# Altium PCB Step..._Breakout.PcbDoc (part 1 of 3)
Units mil, origin at the board's own origin, x right, y up, seen from the top; angles counter-clockwise.
Board outline 1609 x 1792 mil, 2 copper layers (Top Layer, Bottom Layer), stack 57 mil thick; 115 components, 101 nets, 437 pads, 201 vias.
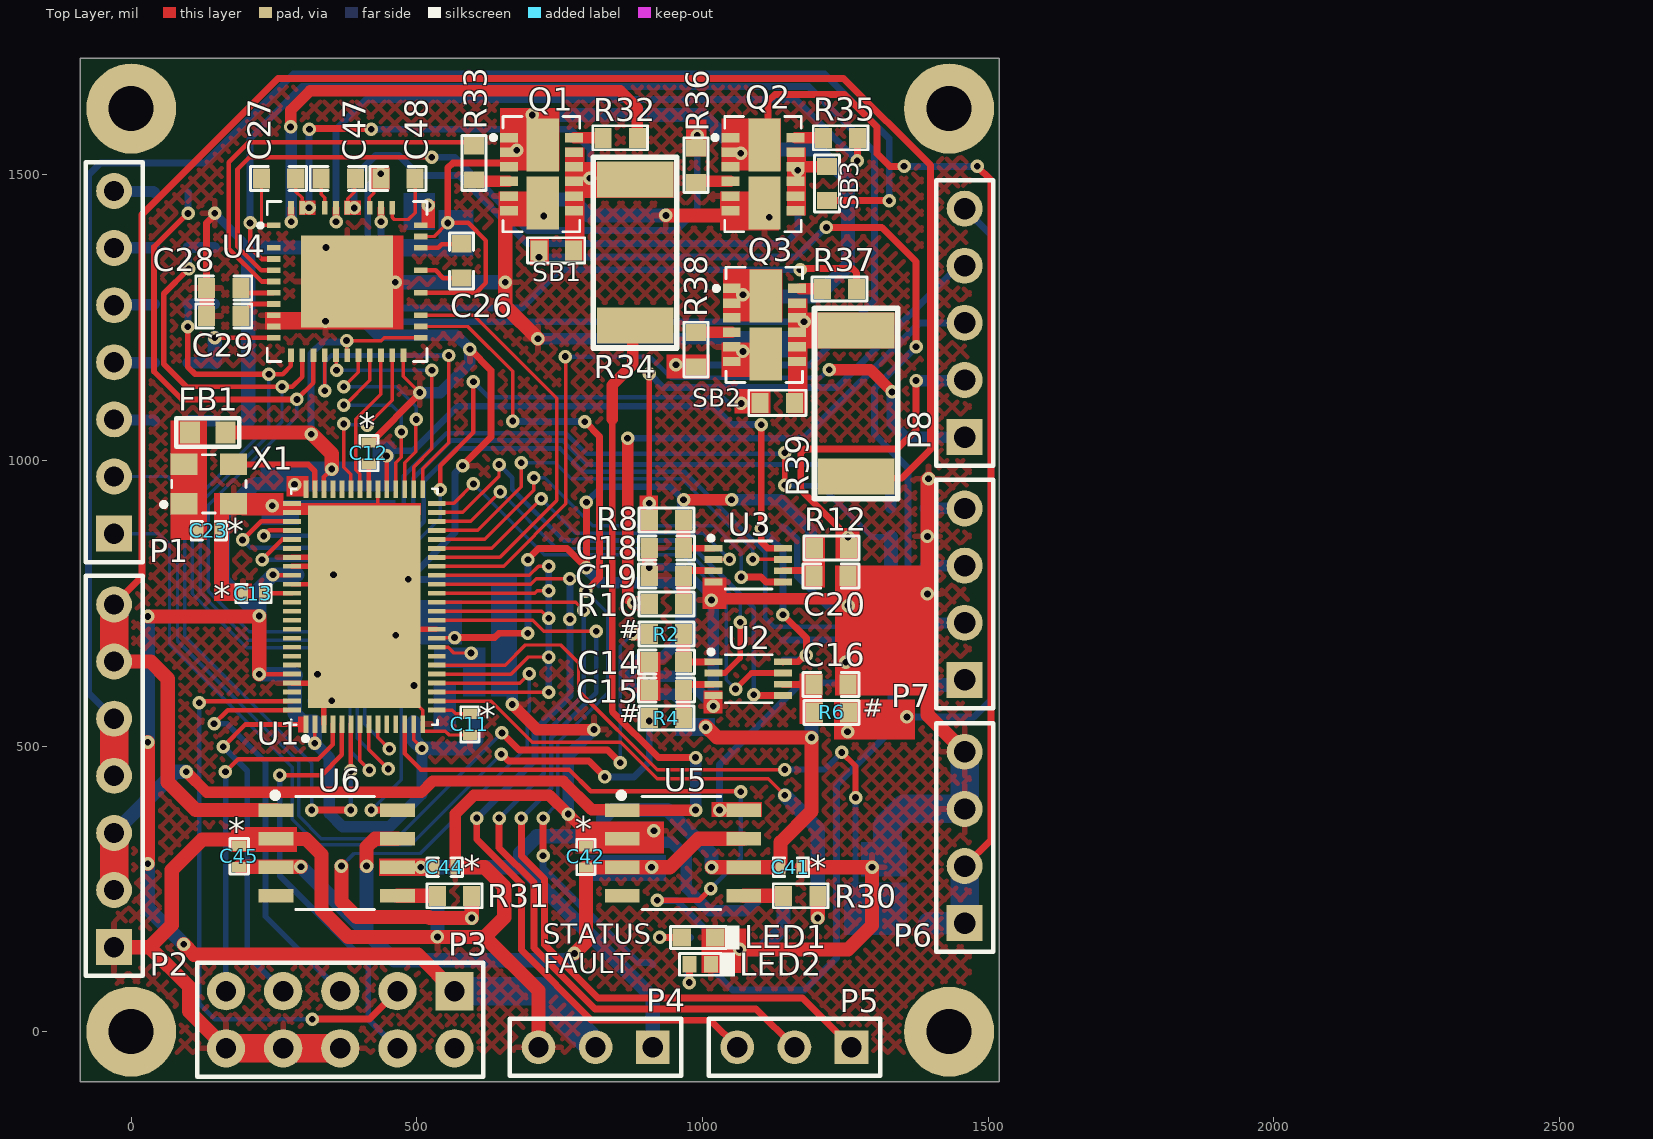
[diagram p0: Top Layer view]
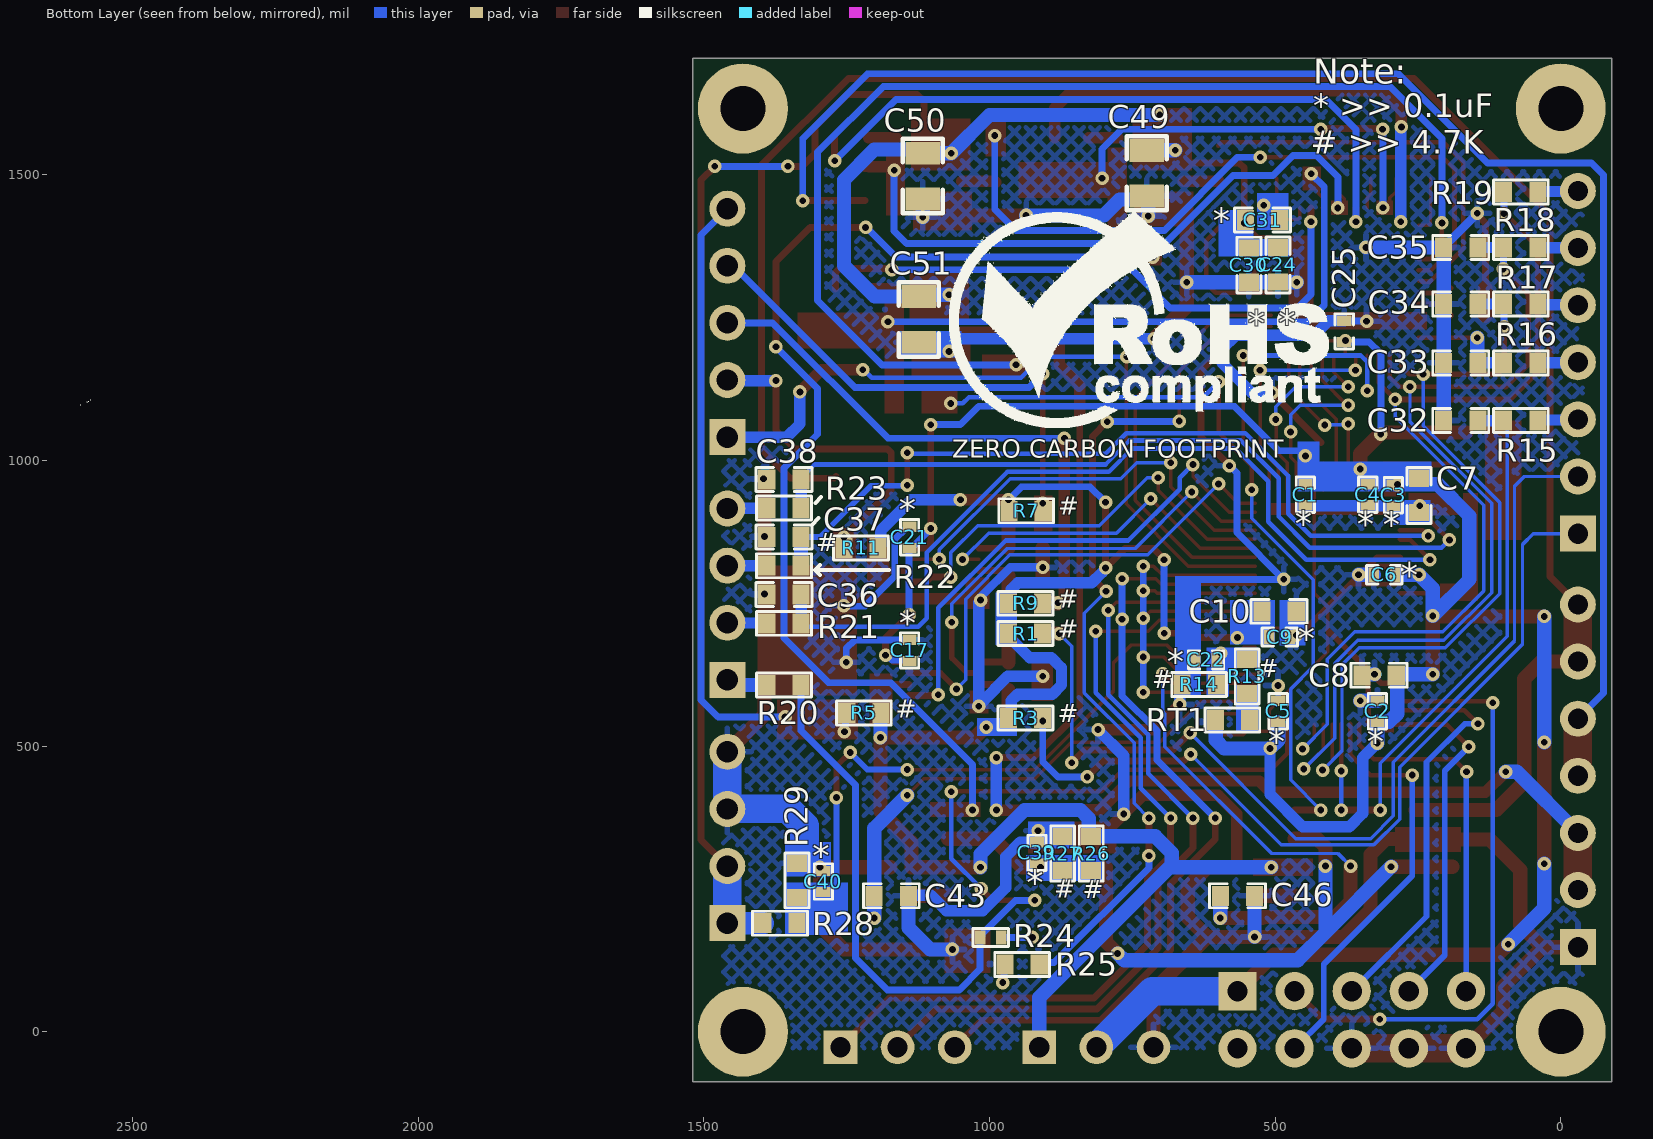
[diagram p1: Bottom Layer view, seen from below]
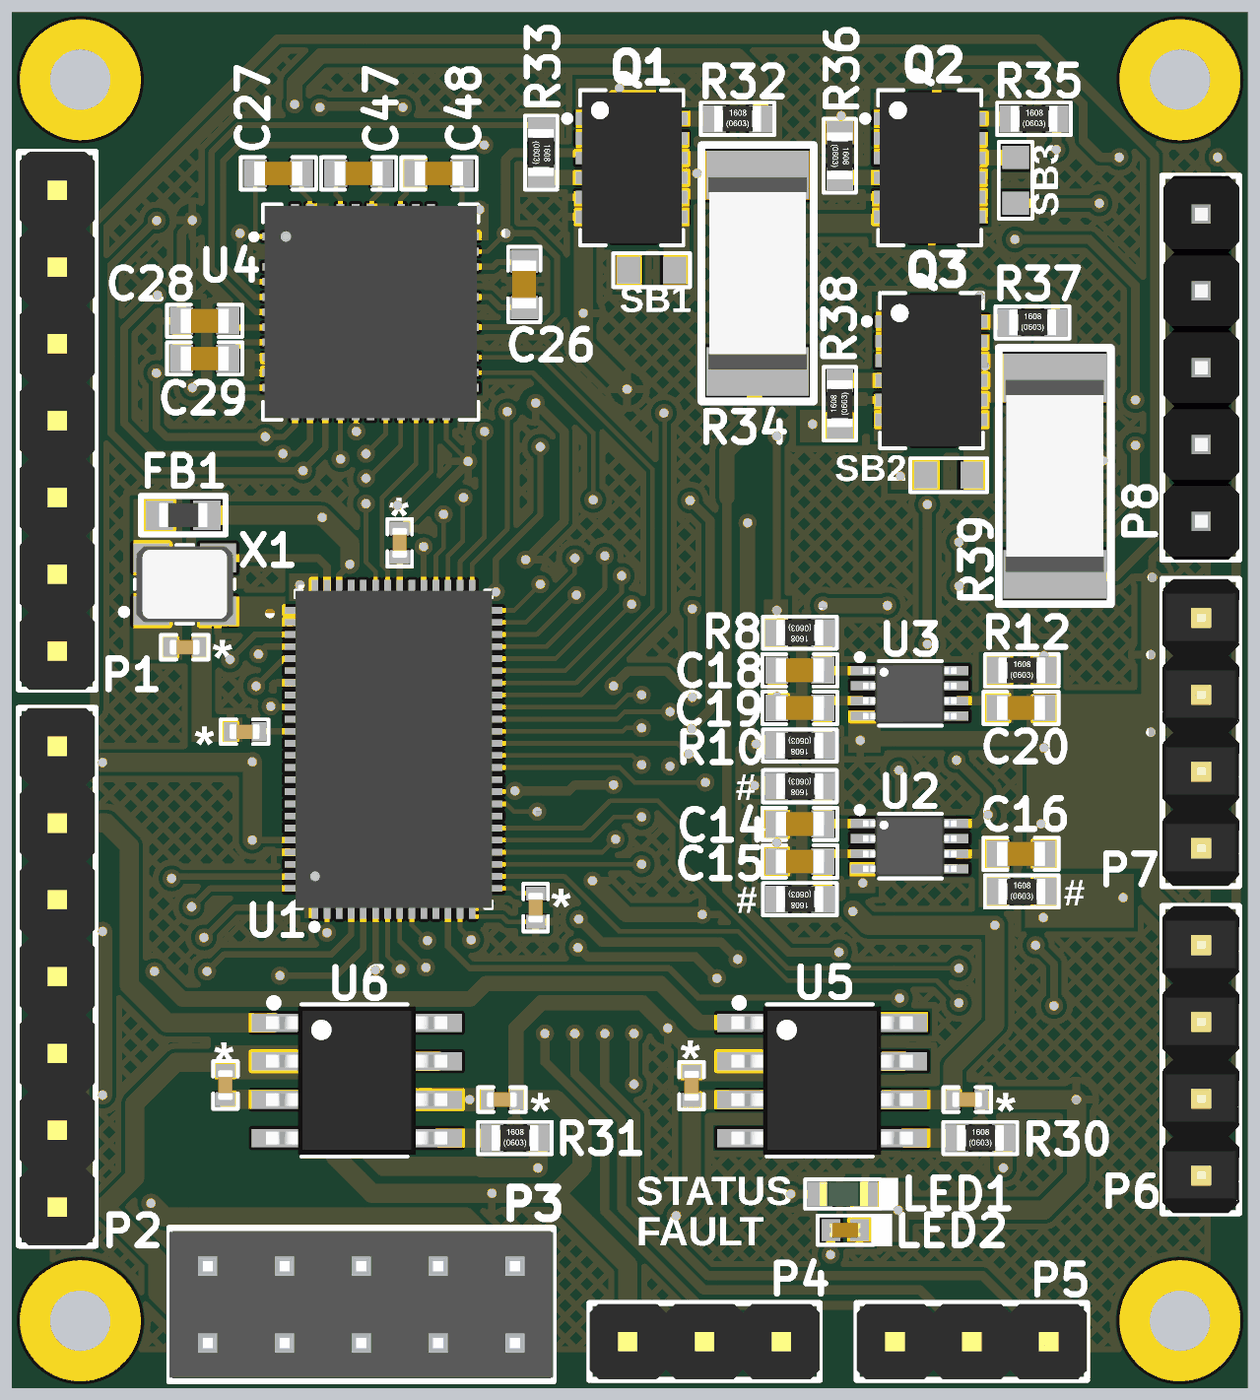
[diagram p3: 3D render of the assembled board from above, using the file's embedded part models]
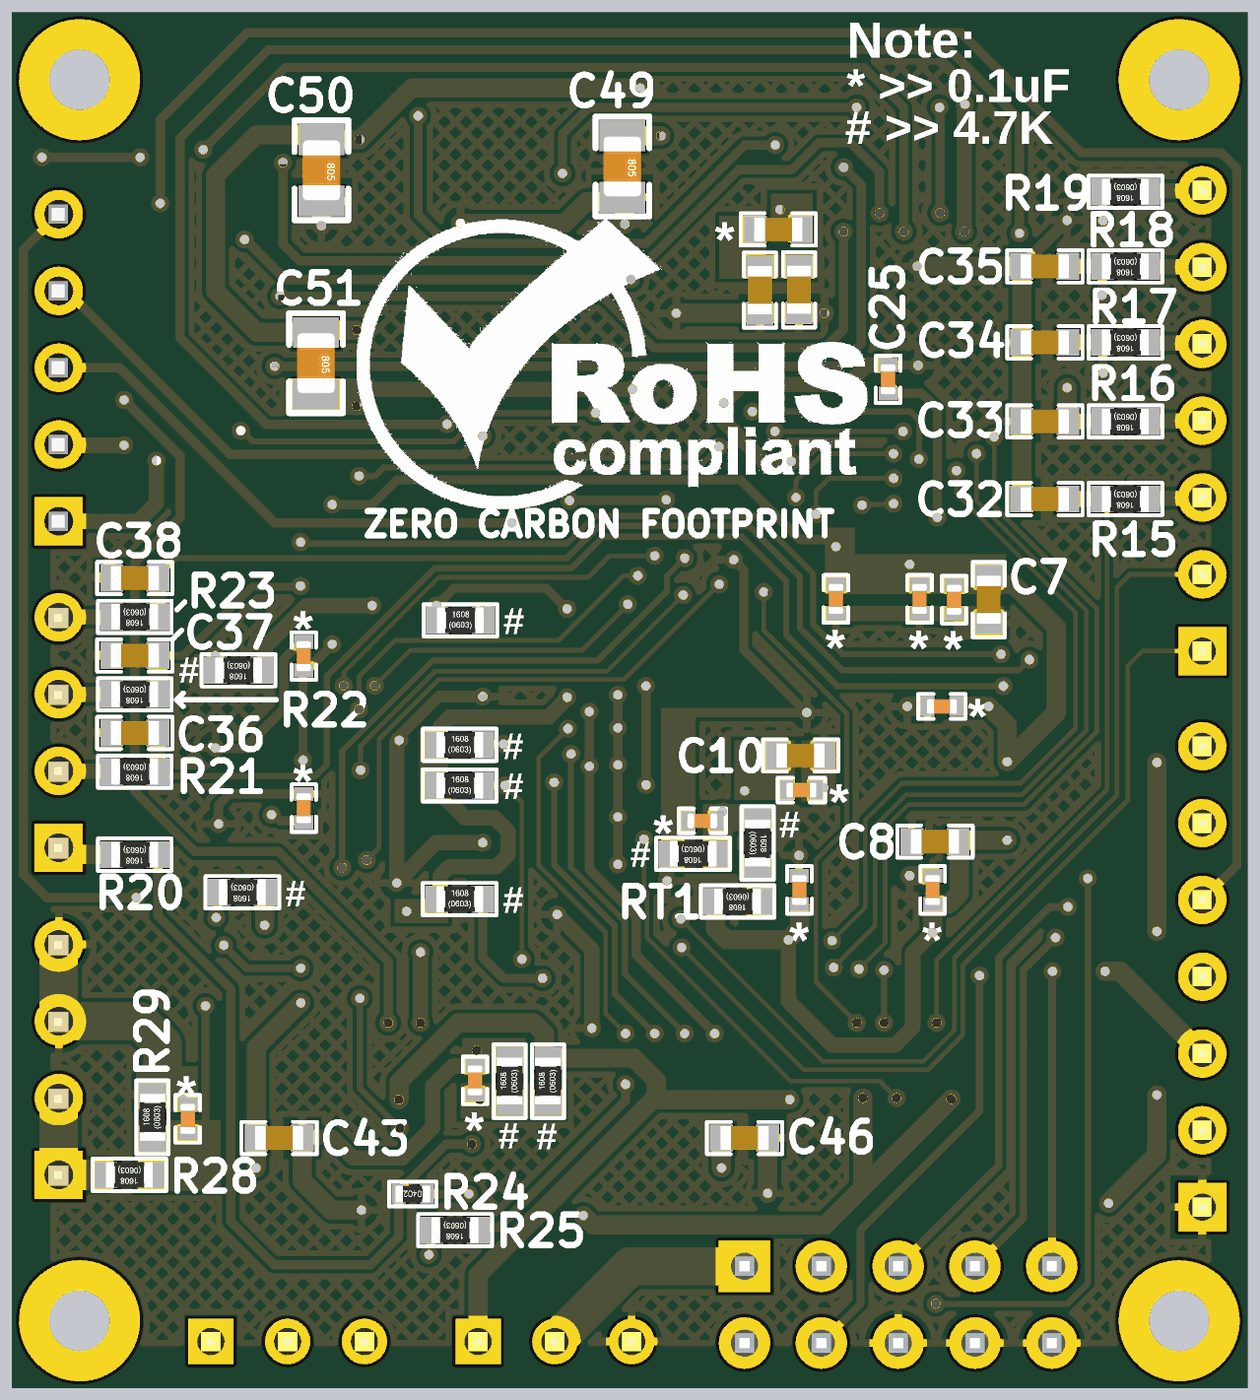
[diagram p4: 3D render of the assembled board from below, using the file's embedded part models]

## Layer stack, top to bottom
Top Solder: solder mask 3, Solder Resist, Dk 3.5
Top Layer: signal copper 10
Dielectric 1: dielectric 37, FR-4, Dk 4.8
Bottom Layer: signal copper 10
Bottom Solder: solder mask 3, Solder Resist, Dk 3.5

## Board outline
-89,-88 -89,1704 1520,1704 1520,-88

## Design rules (kind name [scope] priority, off if disabled: settings)
Clearance [All] p1: gap=5 ignorepadtopadclearanceinfootprint=FALSE
HoleSize [All] p1: absolutevalues=TRUE maxlimit=1000 minlimit=1 maxpercent=80.000 minpercent=20.000
HoleToHoleClearance [All] p1: gap=0 allowstackedmicrovias=TRUE
MinimumSolderMaskSliver [All] p1: minsoldermaskwidth=0
PolygonConnect [All] p1: connectstyle=Relief reliefconductorwidth=10 reliefentries=4 polygonreliefangle="90 Angle" airgapwidth=10
RoutingVias [All] p1: holewidth=11.81 width=23.62 viastyle="Through Hole" minholewidth=11.81 minwidth=23.62 maxholewidth=31.5 maxwidth=62.99
SilkToSilkClearance [All] p1: silktosilkclearance=0
SilkToSolderMaskClearance [IsPad] p1: minsilkscreentomaskgap=0 clearancetoexposedcopper=TRUE
SolderMaskExpansion [All] p1: expansion=4 istentingtop=FALSE
Width [All] p1: maxlimit=100 minlimit=6 preferedwidth=12 minimp=50.000000 maximp=50.000000 favimp=50.000000
25 further rules are at their usual default settings.

## Classes and differential pairs
component class U_TMC6100_Section: C24 C25 C26 C27 C28 C29 C30 C31 C47 C48 U4
component class U_TMC4671_Section: C1 C2 C3 C4 C5 C6 C7 C8 C9 C10 C11 C12 C13 C22 C23 FB1 R13 R14 RT1 U1 X1
component class U_MOSFET_Section: C49 C50 C51 Q1 Q2 Q3 R32 R33 R34 R35 R36 R37 R38 R39 SB1 SB2 SB3
component class U_Current_Sense_Section: C41 C42 C43 C44 C45 C46 R30 R31 U5 U6
component class U_Connector_Section: C32 C33 C34 C35 C36 C37 C38 C39 C40 LED1 LED2 P1 P3 P4 P5 P6 P8 R15 R16 R17 R18 R19 R20 R21 R22 R23 R24 R25 R26 R27 R28 R29
component class U_Buffer_Section: C14 C15 C16 C17 C18 C19 C20 C21 R1 R2 R3 R4 R5 R6 R7 R8 R9 R10 R11 R12 U2 U3

## Components (designator, comment, footprint, x,y, rotation, side; value= is the part's Value field where it differs from the comment)
C1 "0.1UF" Cap0402 447,940 r270 bottom locked
C2 "0.1UF" Cap0402 321,561 r90 bottom locked
C3 "0.1UF" Cap0402 293,939 r270 bottom locked
C4 "0.1UF" Cap0402 338,940 r270 bottom locked
C5 "0.1UF" Cap0402 494.61,561 r90 bottom locked
C6 "0.1UF" Cap0402 309,800 r0 bottom locked
C7 "4.7uF" Cap0603 248,939 r270 bottom locked
C8 "0.47uF" Cap0603 318,624 r0 bottom locked
C9 "0.1UF" Cap0402 492,691 r180 bottom locked
C10 "4.7uF" Cap0603 493,736 r180 bottom locked
C11 "0.1UF" Cap0402 593,538 r90 top locked
C12 "0.1UF" Cap0402 416,1013 r270 top locked
C13 "0.1UF" Cap0402 214,767 r0 top locked
C14 "1nF" Cap0603 937,647 r0 top locked
C15 "1nF" Cap0603 937,598 r0 top locked
C16 "1nF" Cap0603 1225,608 r180 top locked
C17 "0.1UF" Cap0402 1140,667.5 r90 bottom locked
C18 "100pF" Cap0603 937,847 r0 top locked
C19 "100pF" Cap0603 937,798 r0 top locked
C20 "100pF" Cap0603 1225,798 r180 top locked
C21 "0.1UF" Cap0402 1140,865.5 r90 bottom locked
C22 "0.1UF" Cap0402 621,651 r0 bottom locked
C23 "0.1UF" Cap0402 136,877 r180 top locked
C24 "0.1uF/100V" Cap0603 495.06,1342.43 r270 bottom locked
C25 "0.1UF" Cap0402 379,1226 r90 bottom locked
C26 "22nF" Cap0603 578.06,1349.43 r90 top locked
C27 "0.47uF" Cap0603 258,1494 r0 top locked
C28 "2.2uF" Cap0603 162,1302 r0 top locked
C29 "2.2uF" Cap0603 162,1253 r0 top locked
C30 "0.1uF/100V" Cap0603 546,1342 r270 bottom locked
C31 "0.1uF/100V" Cap0603 522,1421 r0 bottom locked
C32 "100pF" Cap0603 175,1070 r0 bottom locked
C33 "100pF" Cap0603 175,1171 r0 bottom locked
C34 "100pF" Cap0603 175,1274 r0 bottom locked
C35 "100pF" Cap0603 175,1373 r0 bottom locked
C36 "100pF" Cap0603 1360,765.4 r0 bottom locked
C37 "100pF" Cap0603 1360,866.2 r0 bottom locked
C38 "100pF" Cap0603 1360,967 r0 bottom locked
C39 "0.1UF" Cap0402 917,313 r90 bottom locked
C40 "0.1UF" Cap0402 1291,263 r90 bottom locked
C41 "0.1UF" Cap0402 1155,288 r0 top locked
C42 "0.1UF" Cap0402 796,306 r90 top locked
C43 "2.2nF" Cap0603 1172,238 r0 bottom locked
C44 "0.1UF" Cap0402 549,288 r0 top locked
C45 "0.1UF" Cap0402 189,307 r90 top locked
C46 "2.2nF" Cap0603 566,238 r0 bottom locked
C47 "0.47uF" Cap0603 362.5,1494 r0 top locked
C48 "0.47uF" Cap0603 467,1494 r180 top locked
C49 "2.2uF" Cap0805 725,1503 r270 bottom locked
C50 "2.2uF" Cap0805 1117,1498 r270 bottom locked
C51 "2.2uF" Cap0805 1124,1247 r270 bottom locked
FB1 "742792651" "IND 0603" 134,1049 r180 top locked
LED1 "D-060306B1" "LED 0603" 993,165 r0 top locked
LED2 "TJ-S1005SW4TGLC2R-A5" "LED 0402" 996,118 r0 top locked
P1 "61300711121" HDR1X7 -30,872 r90 top locked
P2 "61300711121" HDR1X7 -30,148 r90 top locked
P3 "67997-410HLF" HDR2X5 366,21 r180 top locked
P4 "61300311121" HDR1X3 913,-27 r180 top locked
P5 "61300311121" HDR1X3 1261,-27 r180 top locked
P6 "61300411121" HDR1X4 1459,190 r90 top locked
P7 "61300411121" HDR1X4 1459,616 r90 top locked
P8 "61300511121" HDR1X5 1459,1041 r90 top locked
Q1 "FDMD8260L" 12-Power3.3x5 718.09,1501.39 r0 top locked
Q2 "FDMD8260L" 12-Power3.3x5 1106.09,1501.39 r0 top locked
Q3 "FDMD8260L" 12-Power3.3x5 1108.39,1237.29 r0 top locked
R1 "4.7K" Res0603 937,697 r0 bottom locked
R2 "4.7K" Res0603 937,696 r0 top locked
R3 "4.7K" Res0603 937,549 r0 bottom locked
R4 "4.7K" Res0603 937,549 r0 top locked
R5 "4.7K" Res0603 1220,558 r180 bottom locked
R6 "4.7K" Res0603 1226,559 r180 top locked
R7 "4.7K" Res0603 936,912 r0 bottom locked
R8 "1K" Res0603 937,896 r0 top locked
R9 "4.7K" Res0603 937,750 r0 bottom locked
R10 "1K" Res0603 937,749 r0 top locked
R11 "4.7K" Res0603 1225,847 r180 bottom locked
R12 "1K" Res0603 1226,847 r180 top locked
R13 "4.7K" Res0603 549,622 r90 bottom locked
R14 "4.7K" Res0603 633,608 r180 bottom locked
R15 "270R" Res0603 70,1070 r180 bottom locked
R16 "270R" Res0603 70,1171 r180 bottom locked
R17 "270R" Res0603 70,1274 r180 bottom locked
R18 "270R" Res0603 70,1373 r180 bottom locked
R19 "150R" Res0603 70,1470 r180 bottom locked
R20 "150R" Res0603 1360,607 r180 bottom locked
R21 "270R" Res0603 1360,715 r180 bottom locked
R22 "270R" Res0603 1360,815.8 r180 bottom locked
R23 "270R" Res0603 1360,916.6 r180 bottom locked
R24 "100R" Res0402 998,165 r0 bottom locked
R25 "220R" Res0603 943,118 r180 bottom locked
R26 "4.7K" Res0603 822,312 r270 bottom locked
R27 "4.7K" Res0603 872,312 r270 bottom locked
R28 "47K" Res0603 1367,190 r180 bottom locked
R29 "1K" Res0603 1337,265 r270 bottom locked
R30 "1K" Res0603 1172,238 r180 top locked
R31 "1K" Res0603 566,238 r180 top locked
R32 "10R" Res0603 856,1565 r180 top locked
R33 "10R" Res0603 600,1521 r90 top locked
R34 "0.003R" "RES 2512" 882,1364 r90 top locked
R35 "10R" Res0603 1242,1565 r180 top locked
R36 "10R" Res0603 989,1517 r90 top locked
R37 "10R" Res0603 1240,1300 r180 top locked
R38 "10R" Res0603 989,1194 r270 top locked
R39 "0.003R" "RES 2512" 1269,1100 r90 top locked
RT1 "10K" Res0603 575,546 r180 bottom locked
SB1 "Solder Bridge" "Solder Bridge" 744,1368 r180 top locked
SB2 "Solder Bridge" "Solder Bridge" 1131,1101 r180 top locked
SB3 "Solder Bridge" "Solder Bridge" 1218,1485 r270 top locked
U1 "TMC4671-LA" "76-QFN (10.5x6.5)" 408,744 r90 top locked
U2 "74LVC3G17DC,125" 8-VSSOP 1080,618 r0 top locked
U3 "74LVC3G17DC,125" 8-VSSOP 1080,817 r0 top locked
U4 "TMC6100-LA" "37-QFN-EP (7x7)" 378.06,1313.43 r0 top locked
U5 "AD8418WBRZ-RL" SOIC-8 966,313 r0 top locked
U6 "AD8418WBRZ-RL" SOIC-8 360,313 r0 top locked
X1 "25MHz" SX3M25.000M20F30TNN 136,959 r0 top locked

## Footprints (in the part's own frame and the unit in brackets; to place one, negate y for a bottom-side part, rotate by r counter-clockwise, add the part's x,y. Pads: shape width x height; smd on the part's side, far side on the other; paste and mask are expansions set on the pad)
8-VSSOP [mm]
  rect 0.8x0.3 smd mask+0.102: 1(-1.55,0.75) 2(-1.55,0.25) 3(-1.55,-0.25) 4(-1.55,-0.75) 5(1.55,-0.75) 6(1.55,-0.25) 7(1.55,0.25) 8(1.55,0.75)
  silkscreen extent -1.72,-1.07 1.07,1.27, body extent -1.55,-1 1.55,1, height 0.9
12-Power3.3x5 [mm]
  rect 0.8x0.42 smd mask+0.102: 1(-1.45,1.625) 1(-1.45,1.625) 2(-1.45,0.975) 3(-1.45,0.325) 4(-1.45,-0.325) 5(-1.45,-0.975) 6(-1.45,-1.625) 7(1.45,-1.625) 8(1.45,-0.975) 9(1.45,-0.325) 10(1.45,0.325) 11(1.45,0.975) 12(1.45,1.625)
  rect 1.44x2.35 smd mask+0.102: 13(0.066,1.288) 14(0.066,-1.288)
  silkscreen extent -2.21,-2.57 1.7,2.57, body extent -1.65,-2.5 1.65,2.5, height 0.75
"37-QFN-EP (7x7)" [mm]
  rect 0.6x0.254 smd: 1(-3.275,2.5) 2(-3.275,1.5) 3(-3.275,1) 4(-3.275,0.5) 5(-3.275,0) 6(-3.275,-0.5) 7(-3.275,-1) 8(-3.275,-1.5) 9(-3.275,-2) 10(-3.275,-2.5) 22(3.275,-2.5) 23(3.275,-2) 24(3.275,-1.5) 25(3.275,-0.5) 26(3.275,0.5) 27(3.275,1.5) 28(3.275,2) 29(3.275,2.5)
  rect 0.254x0.6 smd: 11(-2.5,-3.275) 12(-2,-3.275) 13(-1.5,-3.275) 14(-1,-3.275) 15(-0.5,-3.275) 16(0,-3.275) 17(0.5,-3.275) 18(1,-3.275) 19(1.5,-3.275) 20(2,-3.275) 21(2.5,-3.275) 30(2,3.275) 31(1.5,3.275) 32(1,3.275) 33(0,3.275) 34(-0.5,3.275) 35(-1,3.275) 36(-2,3.275) 37(-2.5,3.275)
  rect 4.089x4.089 smd: 38(0,0)
  silkscreen extent -3.92,-3.56 3.56,3.56, body extent -3.5,-3.5 3.5,3.5, height 0.89
"76-QFN (10.5x6.5)" [mm]
  rect 0.78x0.22 smd: 1(-5.215,2.6) 2(-5.215,2.2) 3(-5.215,1.8) 4(-5.215,1.4) 5(-5.215,1) 6(-5.215,0.6) 7(-5.215,0.2) 8(-5.215,-0.2) 9(-5.215,-0.6) 10(-5.215,-1) 11(-5.215,-1.4) 12(-5.215,-1.8) 13(-5.215,-2.2) 14(-5.215,-2.6) 39(5.215,-2.6) 40(5.215,-2.2) 41(5.215,-1.8) 42(5.215,-1.4) 43(5.215,-1) 44(5.215,-0.6) 45(5.215,-0.2) 46(5.215,0.2) 47(5.215,0.6) 48(5.215,1) 49(5.215,1.4) 50(5.215,1.8) 51(5.215,2.2) 52(5.215,2.6)
  rect 0.22x0.78 smd: 15(-4.6,-3.215) 16(-4.2,-3.215) 17(-3.8,-3.215) 18(-3.4,-3.215) 19(-3,-3.215) 20(-2.6,-3.215) 21(-2.2,-3.215) 22(-1.8,-3.215) 23(-1.4,-3.215) 24(-1,-3.215) 25(-0.6,-3.215) 26(-0.2,-3.215) 27(0.2,-3.215) 28(0.6,-3.215) 29(1,-3.215) 30(1.4,-3.215) 31(1.8,-3.215) 32(2.2,-3.215) 33(2.6,-3.215) 34(3,-3.215) 35(3.4,-3.215) 36(3.8,-3.215) 37(4.2,-3.215) 38(4.6,-3.215) 53(4.6,3.215) 54(4.2,3.215) 55(3.8,3.215) 56(3.4,3.215) 57(3,3.215) 58(2.6,3.215) 59(2.2,3.215) 60(1.8,3.215) 61(1.4,3.215) 62(1,3.215) 63(0.6,3.215) 64(0.2,3.215) 65(-0.2,3.215) 66(-0.6,3.215) 67(-1,3.215) 68(-1.4,3.215) 69(-1.8,3.215) 70(-2.2,3.215) 71(-2.6,3.215) 72(-3,3.215) 73(-3.4,3.215) 74(-3.8,3.215) 75(-4.2,3.215) 76(-4.6,3.215)
  rect 9x5 smd paste-5: 77(0,0)
  silkscreen extent -5.97,-3.25 5.25,3.25, body extent -5.25,-3.25 5.25,3.25, height 0.89
Cap0402 [mil]
  rect 18x25 smd mask+2.36: 1(-18.5,0) 2(18.5,0)
  silkscreen extent -31,-16 31,16, body extent -20,-10 20,10, height 19
Cap0603 [mil]
  rect 30x35 smd mask+2.36: 1(-30,0) 2(30,0)
  silkscreen extent -49,-21 49,21, body extent -32,-16 31,16, height 34
Cap0805 [mil] "SMD 0805"
  rect 40x60 smd mask+2.76: 1(-40,0) 2(40,0)
  silkscreen extent -65,-35 65,35, body extent -39,-25 39,25, height 30
HDR1X3 [mm] "Connector; Header; 3 Position"
  rect 1.5x1.5 hole 0.9: 1(0,0)
  round 1.5 hole 0.9: 2(2.54,0) 3(5.08,0)
  silkscreen extent -1.27,-1.27 6.35,1.27, body extent -1.27,-1.24 6.35,1.25, height 8.54
HDR1X4 [mm] "Connector; Header; 4 Position"
  rect 1.6x1.6 hole 0.95: 1(0,0)
  round 1.6 hole 0.95: 2(2.54,0) 3(5.08,0) 4(7.62,0)
  silkscreen extent -1.27,-1.27 8.89,1.27, body extent -1.27,-1.27 8.89,1.27, height 9.5
HDR1X5 [mm] "Connector; Header; 5 Position"
  rect 1.6x1.6 hole 0.95: 1(0,0)
  round 1.6 hole 0.95: 2(2.54,0) 3(5.08,0) 4(7.62,0) 5(10.16,0)
  silkscreen extent -1.27,-1.27 11.43,1.27, body extent -1.27,-1.27 11.43,1.23, height 8.65
HDR1X7 [mm] "Connector; Header; 7 Position"
  rect 1.6x1.6 hole 0.9: 1(0,0)
  round 1.6 hole 0.9: 2(2.54,0) 3(5.08,0) 4(7.62,0) 5(10.16,0) 6(12.7,0) 7(15.24,0)
  silkscreen extent -1.27,-1.27 16.51,1.27, body extent -1.27,-1.24 16.51,1.25, height 8.74
HDR2X5 [mm] "Connector; Header; 5x2 Position"
  rect 1.7x1.7 hole 0.9: 1(-5.08,-1.27)
  round 1.7 hole 0.9: 2(-5.08,1.27) 3(-2.54,-1.27) 4(-2.54,1.27) 5(0,-1.27) 6(0,1.27) 7(2.54,-1.27) 8(2.54,1.27) 9(5.08,-1.27) 10(5.08,1.27)
  silkscreen extent -6.35,-2.54 6.35,2.54, body extent -6.35,-2.41 6.35,2.41, height 8.38
"IND 0603" [mm]
  rect 0.9x0.97 smd: 1(-0.785,0) 2(0.785,0)
  silkscreen extent -1.4,-0.64 1.4,0.64, body extent -0.8,-0.4 0.8,0.4, height 0.78
"LED 0402" [mm]
  rect 0.62x0.72 smd: 1(-0.475,0) 2(0.475,0)
  silkscreen extent -0.91,-0.53 1.55,0.53, body extent -0.5,-0.25 0.51,0.25, height 0.45
"LED 0603" [mm] "LED 0603"
  rect 0.82x0.82 smd: 1(-0.75,0) 2(0.75,0)
  silkscreen extent -1.24,-0.53 1.83,0.53, body extent -0.77,-0.4 0.83,0.4, height 0.38
Res0402 [mil]
  rect 18x25 smd mask+4: 1(-18.5,0) 2(18.5,0)
  silkscreen extent -32,-17 32,16, body extent -23,-11 23,11, height 16
Res0603 [mil]
  rect 30x35 smd: 1(-30,0) 2(30,0)
  silkscreen extent -48,-21 48,21, body extent -31,-17 31,17, height 18
"RES 2512" [mm] "0.033O ±1% 2W ±1800ppm/°C 2512 Low Resistors & Current Sense Resistors - Surface Mount RoHS"
  rect 1.6x3.4 smd: 1(-3.25,0) 2(3.25,0)
  silkscreen extent -4.24,-1.85 4.24,1.85, body extent -3.17,-1.63 3.18,1.63, height 0.58
SOIC-8 [mm]
  rect 1.55x0.6 smd: 1(-2.7,1.905) 2(-2.7,0.635) 3(-2.7,-0.635) 4(-2.7,-1.905) 5(2.7,-1.905) 6(2.7,-0.635) 7(2.7,0.635) 8(2.7,1.905)
  silkscreen extent -2.87,-2.51 1.68,2.69, body extent -3,-2.45 3,2.45, height 1.7
"Solder Bridge" [mil] "Solder Bridge ON"
  rect 30x35 smd: 1(-30,0) 2(30,0)
  silkscreen extent -50,-22 50,22
SX3M25.000M20F30TNN [mm]
  rect 1.2x0.95 smd: 1(-1.1,-0.875) 2(1.1,-0.875) 3(1.1,0.875) 4(-1.1,0.875)
  silkscreen extent -2.08,-1.3 1.65,1.3, body extent -1.6,-1.25 1.6,1.25, height 0.8

## Part data
C1 C2 C3 C4 C5 C6 C9 C11 C12 C13 C17 C21 C22 C23 C25 C39 C40 C41 C42 C44 C45: library part CL05B104KB54PNC, "CAP CER 0.1UF 50V X7R 0402", Manufacturer=Samsung, Supplier Part Number 1=1276-CL05B104KB54PNCDKR-ND, Manufacturer Part Number=CL05B104KB54PNC, Pricing 1="1=0.1, 10=0.067, 50=0.0366, 100=0.0299, 500=0.02138, 1000=0.01681, 2500=0.01528, 5000=0.01406 (USD)", Stock 1=8594, Supplier 1=Digi-Key
C7 C10: library part GRM188R61C475KAAJD, "CAP CER 4.7UF 16V X5R 0603", Case Code (Imperial)=0603, Case Code (Metric)=1608, Dielectric=X5R, Manufacturer=Murata, Max Operating Temperature=85°C, Min Operating Temperature=-55°C, Package Quantity=4000, Supplier Part Number 1=490-10481-1-ND, Tolerance=10%, Voltage Rating=16V, Capacitance=4.7uF, Case/Package=0603, ComponentLink1Description=http://components.arrow.com/part/dataview/50250782S9718068N2606?src-supplier=Arrow, ComponentLink1URL=http://components.arrow.com/part/dataview/50250782S9718068N2606?src-supplier=Arrow, Depth=0.8mm, Height=0.8mm, Lead Free="Lead Free", Length=1.6mm, Manufacturer Part Number=GRM188R61C475KAAJD, Material=Ceramic, Mount="Surface Mount", Packaging="Tape and Reel", Pricing 1="1=0.35, 10=0.246, 100=0.1473, 500=0.1105, 1000=0.09331 (USD)", REACH SVHC="No SVHC", Stock 1=407631, Supplier 1=Digi-Key, Termination=SMD/SMT, Thickness=0.037inch, Voltage Rating (DC)=16V, Weight=0.000222oz, Width=0.8mm
C8 C27 C47 C48: library part UMK107B7474KA-TR, "CAP CER 0.47uF 50V X7R 0603", Capacitance=470nF, Case Code (Imperial)=0603, Case Code (Metric)=1608, Dielectric=X7R, Manufacturer="Taiyo Yuden", Max Operating Temperature=125°C, Min Operating Temperature=-55°C, Package Quantity=1, Supplier Part Number 1=587-3170-1-ND, Tolerance=10%, Voltage=50V, Case/Package=0603, Category="Ceramic Capacitors", ComponentLink1Description=https://datasheet.ciiva.com/30063/972umk107b7474ka-tr-30063804.pdf?src-supplier=Onlinecomponents.com, ComponentLink1URL=https://datasheet.ciiva.com/30063/972umk107b7474ka-tr-30063804.pdf?src-supplier=Onlinecomponents.com, ComponentLink2Description=https://datasheet.ciiva.com/11600/umk107b7474ka-tr-ss-11600367.pdf?src-supplier=Avnet, ComponentLink2URL=https://datasheet.ciiva.com/11600/umk107b7474ka-tr-ss-11600367.pdf?src-supplier=Avnet, ComponentLink3Description=https://datasheet.ciiva.com/15922/257umk107b7474ka-tr-15922607.pdf?src-supplier=Onlinecomponents.com, ComponentLink3URL=https://datasheet.ciiva.com/15922/257umk107b7474ka-tr-15922607.pdf?src-supplier=Onlinecomponents.com, ComponentLink4Description=https://datasheet.ciiva.com/6274/mlcc-all-e-6274710.pdf?src-supplier=Digi-Key, ComponentLink4URL=https://datasheet.ciiva.com/6274/mlcc-all-e-6274710.pdf?src-supplier=Digi-Key, ComponentLink5Description=https://datasheet.ciiva.com/5412/mlcc01-e-5412119.pdf?src-supplier=Mouser, ComponentLink5URL=https://datasheet.ciiva.com/5412/mlcc01-e-5412119.pdf?src-supplier=Mouser, ComponentLink6Description=https://datasheet.ciiva.com/6274/mlcc-all-e-6274712.pdf?src-supplier=Digi-Key, ComponentLink6URL=https://datasheet.ciiva.com/6274/mlcc-all-e-6274712.pdf?src-supplier=Digi-Key, ComponentLink7Description=https://datasheet.ciiva.com/6274/mlcc-all-e-6274713.pdf?src-supplier=Digi-Key, ComponentLink7URL=https://datasheet.ciiva.com/6274/mlcc-all-e-6274713.pdf?src-supplier=Digi-Key, Construction=Flat, Depth=0.8mm, Halogen Free="Halogen Free", Height=0.8mm, Lead Free="Lead Free", Length=1.6mm, Manufacturer Part Number=UMK107B7474KA-TR, Mount="Surface Mount", Packaging="Tape and Reel", Pricing 1="1=0.21000, 10=0.14800, 50=0.08400, 100=0.06950, 500=0.04876, 1000=0.04036 (USD)", Radiation Hardening=No, RoHS=Yes, RoHS Compliant=Yes, Series=M, Stock 1=81, Supplier 1=Digi-Key, Termination=SMD/SMT, Thickness=0.035inch, Voltage Rating=50V, Voltage Rating (DC)=50V, Width=0.031inch
C14 C15 C16: library part CL10B102KC8NNNC, "CAP CER 1nF 100V X7R 0603", Case Code (Imperial)=0603, Case Code (Metric)=1608, Dielectric=X7R, Manufacturer=Samsung, Max Operating Temperature=125°C, Min Operating Temperature=-55°C, Package Quantity=1, Tolerance=10%, Voltage=100V, Capacitance=1nF, Case/Package=0603, Category="Ceramic Capacitors", ComponentLink1Description=https://datasheet.ciiva.com/25799/cl10b102kc8nnnc-25799476.pdf?src-supplier=Digi-Key, ComponentLink1URL=https://datasheet.ciiva.com/25799/cl10b102kc8nnnc-25799476.pdf?src-supplier=Digi-Key, ComponentLink2Description=https://datasheet.ciiva.com/29198/458286-da-01-en-vs-kondensator-0603-29198496.pdf?src-supplier=Conrad, ComponentLink2URL=https://datasheet.ciiva.com/29198/458286-da-01-en-vs-kondensator-0603-29198496.pdf?src-supplier=Conrad, ComponentLink3Description=https://datasheet.ciiva.com/26838/getdatasheetpartid-640779-26838395.pdf?src-supplier=Verical, ComponentLink3URL=https://datasheet.ciiva.com/26838/getdatasheetpartid-640779-26838395.pdf?src-supplier=Verical, ComponentLink4Description=https://datasheet.ciiva.com/26310/mlcc-catalogdownload2013-eng-26310266.pdf?src-supplier=Distrelec, ComponentLink4URL=https://datasheet.ciiva.com/26310/mlcc-catalogdownload2013-eng-26310266.pdf?src-supplier=Distrelec, ComponentLink5Description=https://datasheet.ciiva.com/16199/cl05b104kq5nnnc-16199246.pdf?src-supplier=Future+Electronics, ComponentLink5URL=https://datasheet.ciiva.com/16199/cl05b104kq5nnnc-16199246.pdf?src-supplier=Future+Electronics, Construction=Flat, Contact Plating=Tin, Depth=0.8mm, Height=0.8mm, Lead Free="Lead Free", Length=1.6mm, Manufacturer Part Number=CL10B102KC8NNNC, Material=Ceramic, Mount="Surface Mount", Packaging="Tape and Reel", Pricing 1="4000=0.00988, 8000=0.00987, 16000=0.00986, 24000=0.00985, 32000=0.00984, 40000=0.00982, 400000=0.00981 (USD)", Radiation Hardening=No, RoHS=Yes, RoHS Compliant=Yes, Series=CL, Stock 1=184000, Supplier 1=Avnet, Supplier Part Number 1=CL10B102KC8NNNC, Thickness=0.035inch, Voltage Rating=100V, Voltage Rating (DC)=100V, Width=0.031inch
C18 C19 C20 C32 C33 C34 C35 C36 C37 C38: library part GRM1885C1H101JA01D, "CAP CER 100PF 50V C0G/NP0 0603", Case Code (Imperial)=0603, Case Code (Metric)=1608, Dielectric=C0G, Dielectric Material=Ceramic, Insulation Resistance=10GR, Manufacturer=Murata, Max Operating Temperature=125°C, Min Operating Temperature=-55°C, Package Quantity=1, Temperature Coefficient=30ppm/°C, Tolerance=5%, Voltage=50V, Capacitance=100pF, Case/Package=0603, Category="Ceramic Capacitors", ComponentLink1Description=https://datasheet.ciiva.com/131/product-131088.pdf?src-supplier=Digi-Key, ComponentLink1URL=https://datasheet.ciiva.com/131/product-131088.pdf?src-supplier=Digi-Key, ComponentLink2Description=https://datasheet.ciiva.com/3777/grm1885c1h101ja0123-3777264.pdf?src-supplier=Arrow+Electronics, ComponentLink2URL=https://datasheet.ciiva.com/3777/grm1885c1h101ja0123-3777264.pdf?src-supplier=Arrow+Electronics, ComponentLink3Description=https://datasheet.ciiva.com/18100/getdatasheetpartid-26823-18100641.pdf?src-supplier=Verical, ComponentLink3URL=https://datasheet.ciiva.com/18100/getdatasheetpartid-26823-18100641.pdf?src-supplier=Verical, ComponentLink4Description=https://datasheet.ciiva.com/29149/450134-da-01-en-vs-kondensator-0603-29149008.pdf?src-supplier=Conrad, ComponentLink4URL=https://datasheet.ciiva.com/29149/450134-da-01-en-vs-kondensator-0603-29149008.pdf?src-supplier=Conrad, ComponentLink5Description=https://datasheet.ciiva.com/7828/4360-7828890.pdf?src-supplier=Element14, ComponentLink5URL=https://datasheet.ciiva.com/7828/4360-7828890.pdf?src-supplier=Element14, ComponentLink6Description=https://datasheet.ciiva.com/14116/grmseries-tc-hitype-eng-14116815.pdf?src-supplier=Distrelec, ComponentLink6URL=https://datasheet.ciiva.com/14116/grmseries-tc-hitype-eng-14116815.pdf?src-supplier=Distrelec, ComponentLink7Description=https://datasheet.ciiva.com/14116/grmseries-tc-hitype-eng-14116828.pdf?src-supplier=Distrelec, ComponentLink7URL=https://datasheet.ciiva.com/14116/grmseries-tc-hitype-eng-14116828.pdf?src-supplier=Distrelec, ComponentLink8Description=https://datasheet.ciiva.com/28556/4360-28556551.pdf?src-supplier=Element14, ComponentLink8URL=https://datasheet.ciiva.com/28556/4360-28556551.pdf?src-supplier=Element14, ComponentLink9Description=https://datasheet.ciiva.com/131/partnumbering-e-01-131087.pdf?src-supplier=Digi-Key, ComponentLink9URL=https://datasheet.ciiva.com/131/partnumbering-e-01-131087.pdf?src-supplier=Digi-Key, ComponentLink10Description=https://datasheet.ciiva.com/131/partnumbering-e-01-131089.pdf?src-supplier=Digi-Key, ComponentLink10URL=https://datasheet.ciiva.com/131/partnumbering-e-01-131089.pdf?src-supplier=Digi-Key, ComponentLink11Description=https://datasheet.ciiva.com/7828/4360-7828889.pdf?src-supplier=Element14, ComponentLink11URL=https://datasheet.ciiva.com/7828/4360-7828889.pdf?src-supplier=Element14, ComponentLink12Description=https://datasheet.ciiva.com/7828/4360-7828891.pdf?src-supplier=Element14, ComponentLink12URL=https://datasheet.ciiva.com/7828/4360-7828891.pdf?src-supplier=Element14, ComponentLink13Description=https://datasheet.ciiva.com/11605/c02e-11605557.pdf?src-supplier=Avnet, ComponentLink13URL=https://datasheet.ciiva.com/11605/c02e-11605557.pdf?src-supplier=Avnet, ComponentLink14Description=https://datasheet.ciiva.com/16291/product-16291613.pdf?src-supplier=Future+Electronics, ComponentLink14URL=https://datasheet.ciiva.com/16291/product-16291613.pdf?src-supplier=Future+Electronics, Depth=0.8mm, Height=0.8mm, Lead Free="Lead Free", Length=1.6mm, Manufacturer Part Number=GRM1885C1H101JA01D, Material=Ceramic, Mount="Surface Mount", Number of Pins=2, Packaging="Tape and Reel", Pricing 1="4000=0.03790, 8000=0.03760, 12000=0.03720, 40000=0.02940 (USD)", Radiation Hardening=No, REACH SVHC=Unknown, RoHS=Yes, RoHS Compliant=Yes, Stock 1=3884000, Supplier 1="Arrow Electronics", Supplier Part Number 1=GRM1885C1H101JA01D, Termination=SMD/SMT, Thickness=0.035inch, Voltage Rating=50V, Voltage Rating (DC)=50V, Weight=7.1E-05oz, Width=0.031inch
C24 C30 C31: library part CC0603KRX7R0BB104, "CAP CER 0.1UF 100V X7R 0603", Capacitance=100nF, Case Code (Imperial)=0603, Case Code (Metric)=1608, Dielectric=X7R, Manufacturer=Yageo, Max Operating Temperature=125°C, Min Operating Temperature=-55°C, Package Quantity=4000, Resistor Type=Ceramic, Supplier Part Number 1=311-1523-1-ND, Tolerance=10%, Voltage Rating=100V, Case/Package=0603, Category="Ceramic Capacitors", ComponentLink1Description=https://datasheet.ciiva.com/6277/mlccorderingcode-6277030.pdf?src-supplier=Digi-Key, ComponentLink1URL=https://datasheet.ciiva.com/6277/mlccorderingcode-6277030.pdf?src-supplier=Digi-Key, ComponentLink2Description=https://datasheet.ciiva.com/6277/mlccorderingcode-6277081.pdf?src-supplier=Digi-Key, ComponentLink2URL=https://datasheet.ciiva.com/6277/mlccorderingcode-6277081.pdf?src-supplier=Digi-Key, ComponentLink3Description=https://datasheet.ciiva.com/6277/mlccorderingcode-6277082.pdf?src-supplier=Digi-Key, ComponentLink3URL=https://datasheet.ciiva.com/6277/mlccorderingcode-6277082.pdf?src-supplier=Digi-Key, Depth=0.8mm, Lead Free="Lead Free", Length=0.063inch, Manufacturer Part Number=CC0603KRX7R0BB104, Mount="Surface Mount", Packaging="Tape and Reel", Pricing 1="1=0.19000, 10=0.13500, 50=0.07680, 100=0.06370, 500=0.04466, 1000=0.03696 (USD)", RoHS=Yes, RoHS Compliant=Yes, Series=CC, Stock 1=60476, Supplier 1=Digi-Key, Termination=SMD/SMT, Thickness=0.035inch, Voltage Rating (DC)=100V, Weight=7.1E-05oz, Width=0.031inch
C26: library part C0603C223K1RAC7867, "CAP CER 22nF 100V X7R 0603", Case Code (Imperial)=0603, Case Code (Metric)=1608, Dielectric=X7R, Dielectric Material=Ceramic, Manufacturer=KEMET, Manufacturer Part Number=C0603C223K1RACTU, Max Operating Temperature=125°C, Min Operating Temperature=-55°C, Package Quantity=4000, Tolerance=10%, Voltage=100V, Capacitance=22nF, Case/Package=0603, Category="Ceramic Capacitors", ComponentLink1Description=https://datasheet.ciiva.com/5416/kem-c1002-x7r-smd-5416629.pdf?src-supplier=Mouser, ComponentLink1URL=https://datasheet.ciiva.com/5416/kem-c1002-x7r-smd-5416629.pdf?src-supplier=Mouser, ComponentLink2Description=https://datasheet.ciiva.com/18192/getdatasheetpartid-306025-18192903.pdf?src-supplier=Verical, ComponentLink2URL=https://datasheet.ciiva.com/18192/getdatasheetpartid-306025-18192903.pdf?src-supplier=Verical, ComponentLink3Description=https://datasheet.ciiva.com/18101/getdatasheetpartid-38414-18101194.pdf?src-supplier=Verical, ComponentLink3URL=https://datasheet.ciiva.com/18101/getdatasheetpartid-38414-18101194.pdf?src-supplier=Verical, Construction=Flat, Depth=0.8mm, Dissipation Factor=2.5%, Height=0.8mm, Lead Pitch=0.7mm, Length=1.6mm, Mount="Surface Mount,PCB", Number of Pins=2, Packaging="Tape and Reel", Pricing 1="4000=0.03660 (USD)", Radiation Hardening=No, REACH SVHC="No SVHC", RoHS=Yes, RoHS Compliant=Yes, Series=C, Stock 1=108000, Supplier 1="Arrow Electronics", Supplier Part Number 1=C0603C223K1RACTU, Termination=SMD/SMT, Thickness=0.034inch, Voltage Rating=100V, Voltage Rating (DC)=100V, Width=0.031inch
C28 C29: library part CL10A225KO8NNNC, "CAP CER 2.2UF 16V X5R 0603", Case Code (Imperial)=0603, Case Code (Metric)=1608, Dielectric=X5R, Manufacturer=Samsung, Max Operating Temperature=85°C, Min Operating Temperature=-55°C, Package Quantity=4000, Supplier Part Number 1=1276-1040-1-ND, Tolerance=10%, Voltage=16V, Capacitance=2.2uF, Case/Package=0603, ComponentLink1Description=https://www.verical.com/server-webapp/html/getDatasheet?partID=355165&src-supplier=Verical, ComponentLink1URL=https://www.verical.com/server-webapp/html/getDatasheet?partID=355165&src-supplier=Verical, ComponentLink2Description=http://www.samsungsem.com/kr/support/product-search/mlcc/__icsFiles/afieldfile/2016/08/18/S_CL10A225KO8NNNC.pdf?src-supplier=Digi-Key, ComponentLink2URL=http://www.samsungsem.com/kr/support/product-search/mlcc/__icsFiles/afieldfile/2016/08/18/S_CL10A225KO8NNNC.pdf?src-supplier=Digi-Key, ComponentLink3Description=http://www1.futureelectronics.com/doc/SAMSUNG%20PASSIVE/CL05B104KQ5NNNC.pdf?src-supplier=Future+Electronics, ComponentLink3URL=http://www1.futureelectronics.com/doc/SAMSUNG%20PASSIVE/CL05B104KQ5NNNC.pdf?src-supplier=Future+Electronics, ComponentLink4Description=https://produktinfo.conrad.com/datenblaetter/450000-474999/457919-da-01-en-VS_KONDENSATOR_0603.pdf?src-supplier=Conrad, ComponentLink4URL=https://produktinfo.conrad.com/datenblaetter/450000-474999/457919-da-01-en-VS_KONDENSATOR_0603.pdf?src-supplier=Conrad, Contact Plating=Tin, Depth=0.8mm, Height=0.8mm, Lead Free="Lead Free", Length=1.6mm, Manufacturer Part Number=CL10A225KO8NNNC, Material=Ceramic, Mount="Surface Mount", Packaging="Tape and Reel", Pricing 1="1=0.13, 10=0.092, 100=0.0435, 500=0.03048, 1000=0.02524 (USD)", Radiation Hardening=No, Stock 1=421786, Supplier 1=Digi-Key, Thickness=0.035inch, Voltage Rating=16V, Voltage Rating (DC)=16V, Width=0.031inch
C43 C46: library part CC0603KRX7R9BB222, "CAP CER 2200PF 50V X7R 0603", Case Code (Imperial)=0603, Case Code (Metric)=1608, Dielectric=X7R, Insulation Resistance=10GR, Manufacturer=Yageo, Max Operating Temperature=125°C, Min Operating Temperature=-55°C, Package Quantity=1, Resistor Type=Ceramic, Tolerance=10%, Voltage=50V, Capacitance=2.2nF, Case/Package=0603, Category="Ceramic Capacitors", ComponentLink1Description=https://datasheet.ciiva.com/23768/1079489-23768004.pdf?src-supplier=Newark, ComponentLink1URL=https://datasheet.ciiva.com/23768/1079489-23768004.pdf?src-supplier=Newark, ComponentLink2Description=https://datasheet.ciiva.com/11788/0900766b8079c870-11788403.pdf?src-supplier=RSComponents, ComponentLink2URL=https://datasheet.ciiva.com/11788/0900766b8079c870-11788403.pdf?src-supplier=RSComponents, ComponentLink3Description=https://datasheet.ciiva.com/26862/getdatasheetpartid-403587-26862854.pdf?src-supplier=Verical, ComponentLink3URL=https://datasheet.ciiva.com/26862/getdatasheetpartid-403587-26862854.pdf?src-supplier=Verical, ComponentLink4Description=https://datasheet.ciiva.com/8033/70765-8033863.pdf?src-supplier=Element14, ComponentLink4URL=https://datasheet.ciiva.com/8033/70765-8033863.pdf?src-supplier=Element14, ComponentLink5Description=https://datasheet.ciiva.com/7978/1489800-7978172.pdf?src-supplier=Element14, ComponentLink5URL=https://datasheet.ciiva.com/7978/1489800-7978172.pdf?src-supplier=Element14, ComponentLink6Description=https://datasheet.ciiva.com/28450/1489800-28450632.pdf?src-supplier=Element14, ComponentLink6URL=https://datasheet.ciiva.com/28450/1489800-28450632.pdf?src-supplier=Element14, ComponentLink7Description=https://datasheet.ciiva.com/155/mlccorderingcode-155921.pdf?src-supplier=Digi-Key, ComponentLink7URL=https://datasheet.ciiva.com/155/mlccorderingcode-155921.pdf?src-supplier=Digi-Key, ComponentLink8Description=https://datasheet.ciiva.com/155/mlccorderingcode-155920.pdf?src-supplier=Digi-Key, ComponentLink8URL=https://datasheet.ciiva.com/155/mlccorderingcode-155920.pdf?src-supplier=Digi-Key, ComponentLink9Description=https://datasheet.ciiva.com/155/mlccorderingcode-155922.pdf?src-supplier=Digi-Key, ComponentLink9URL=https://datasheet.ciiva.com/155/mlccorderingcode-155922.pdf?src-supplier=Digi-Key, ComponentLink10Description=https://datasheet.ciiva.com/8033/1489800-8033864.pdf?src-supplier=Element14, ComponentLink10URL=https://datasheet.ciiva.com/8033/1489800-8033864.pdf?src-supplier=Element14, ComponentLink11Description=https://datasheet.ciiva.com/8033/1489800-8033862.pdf?src-supplier=Element14, ComponentLink11URL=https://datasheet.ciiva.com/8033/1489800-8033862.pdf?src-supplier=Element14, Depth=0.8mm, Dissipation Factor=2.5%, Halogen Free="Halogen Free", Height=0.8mm, Lead Free="Lead Free", Length=1.6mm, Manufacturer Part Number=CC0603KRX7R9BB222, Mount="Surface Mount", Number of Pins=2, Packaging="Tape and Reel", Pricing 1="4000=0.01010, 8000=0.00890, 12000=0.00830, 40000=0.00750 (USD)", Radiation Hardening=No, REACH SVHC="No SVHC", RoHS=Yes, RoHS Compliant=Yes, Series=CC, Stock 1=84000, Supplier 1="Arrow Electronics", Supplier Part Number 1=CC0603KRX7R9BB222, Termination=SMD/SMT, Thickness=0.035inch, Voltage Rating=50V, Voltage Rating (DC)=50V, Width=0.031inch
C49 C50 C51: library part GRM21BD72A225KE01L, "CAP CER 2.2UF 100V X7T 0805", Manufacturer=Murata, Supplier Part Number 1=490-GRM21BD72A225KE01LCT-ND, Category="Ceramic Capacitors", Manufacturer Part Number=GRM21BD72A225KE01L, Pricing 1="1=0.57000, 10=0.40200, 50=0.30360, 100=0.26450, 500=0.19592, 1000=0.16654 (USD)", RoHS=No, RoHS Compliant=Yes, Stock 1=1904, Supplier 1=Digi-Key
FB1: "Ferrite Beads WE-CBF 0603 SMD Bead 100MHz 600Ohm 1000mA", Case Code (Imperial)=0603, Case Code (Metric)=1608, Case/Package=SMD/SMT, Current Rating=1A, DC Resistance (DCR)=200mR, Inductance=0.36H, Manufacturer="Wurth Electronics", Max Operating Temperature=125°C, Min Operating Temperature=-55°C, Package Quantity=1, Supplier Part Number 1=1241835, Test Frequency=100MHz, Tolerance=25%, Category="Ferrite Beads and Chips", ComponentLink1Description=https://datasheet.ciiva.com/1475/1705833-1475349.pdf?src-supplier=Farnell, ComponentLink1URL=https://datasheet.ciiva.com/1475/1705833-1475349.pdf?src-supplier=Farnell, ComponentLink2Description=https://datasheet.ciiva.com/11803/0900766b80d2e079-11803680.pdf?src-supplier=RSComponents, ComponentLink2URL=https://datasheet.ciiva.com/11803/0900766b80d2e079-11803680.pdf?src-supplier=RSComponents, ComponentLink3Description=https://datasheet.ciiva.com/4940/742792651-72243-4940492.pdf?src-supplier=Mouser, ComponentLink3URL=https://datasheet.ciiva.com/4940/742792651-72243-4940492.pdf?src-supplier=Mouser, ComponentLink4Description=https://datasheet.ciiva.com/1013/742792651-1013527.pdf?src-supplier=Digi-Key, ComponentLink4URL=https://datasheet.ciiva.com/1013/742792651-1013527.pdf?src-supplier=Digi-Key, ComponentLink5Description=https://datasheet.ciiva.com/22711/1705833-22711420.pdf?src-supplier=Element14, ComponentLink5URL=https://datasheet.ciiva.com/22711/1705833-22711420.pdf?src-supplier=Element14, ComponentLink6Description=https://datasheet.ciiva.com/1013/742792651-1013528.pdf?src-supplier=Digi-Key, ComponentLink6URL=https://datasheet.ciiva.com/1013/742792651-1013528.pdf?src-supplier=Digi-Key, ComponentLink7Description=https://datasheet.ciiva.com/1013/742792651-1013529.pdf?src-supplier=Digi-Key, ComponentLink7URL=https://datasheet.ciiva.com/1013/742792651-1013529.pdf?src-supplier=Digi-Key, Core Material=Ferrite, Depth=0.8mm, Height=0.8mm, Impedance=600R, Lead Free="Lead Free", Length=1.6mm, Manufacturer Part Number=742792651, Material=Ferrite, Max Current Rating=1A, Max DC Current=1A, Mount="Surface Mount", Number of Lines=1, Packaging="Tape and Reel", Pricing 1="50=0.13400, 500=0.12400, 2500=0.11200, 5000=0.10000, 12500=0.09000 (GBP)", REACH SVHC=Unknown, Resistance=200mR, RoHS=Yes, RoHS Compliant=Yes, Series=WE-CBF, Stock 1=6200, Supplier 1=RSComponents, Termination=SMD/SMT, Weight=0.000141oz, Width=0.8mm
LED1: "blue 0603 Light Emitting Diodes (LED) ROHS", Manufacturer=ARKLED, ComponentLink1Description=LCSC, ComponentLink1URL=https://lcsc.com/product-detail/Light-Emitting-Diodes-span-style-background-color-ff0-LED-span_ARKLED-Wuxi-ARK-Tech-Elec-D-060306B1_C118339.html, Manufacturer Part Number=D-060306B1
LED2: "Red 625nm 0402 Light Emitting Diodes (LED) RoHS", Manufacturer=TOGIALED, Package=0402, Manufacturer Part No=TJ-S1005SW4TGLC2R-A5
P1 P2: "CONN HEADER VERT 7POS 2.54MM", Color=Black, Manufacturer="Wurth Electronics", Supplier Part Number 1=732-5320-ND, ComponentLink1Description=https://katalog.we-online.de/em/datasheet/6130xx11121.pdf?src-supplier=Digi-Key, ComponentLink1URL=https://katalog.we-online.de/em/datasheet/6130xx11121.pdf?src-supplier=Digi-Key, Connector Type="Male Pin", Contact Material=Copper, Contact Mating Length=0.236inch, Contact Plating=Gold, Gender=Male, Manufacturer Part Number=61300711121, Mount="Through Hole", Number of Contacts=7, Number of Positions=7, Number of Rows=1, Packaging=Bulk, Pitch=0.1inch, Pricing 1="1=0.37, 10=0.315, 25=0.2632, 50=0.219, 100=0.199, 1000=0.181 (USD)", REACH SVHC=Unknown, Stock 1=4017, Supplier 1=Digi-Key, Termination=Solder
P3: "CONN HEADER VERT 10POS 2.54MM", Color=Black, Current Rating=3A, Flammability Rating="UL94 V-0", Insulation Resistance=5GR, Manufacturer="Amphenol FCI", Max Operating Temperature=125°C, Max Voltage Rating (AC)=1.5kV, Min Operating Temperature=-65°C, Package Quantity=100, Supplier Part Number 1=609-3243-ND, ComponentLink1Description=http://www.mouser.com/ds/2/154/bus-12-050-356030.pdf?src-supplier=Mouser, ComponentLink1URL=http://www.mouser.com/ds/2/154/bus-12-050-356030.pdf?src-supplier=Mouser, ComponentLink2Description=http://portal.fciconnect.com/Comergent/fci/drawing/67996.pdf?src-supplier=Avnet, ComponentLink2URL=http://portal.fciconnect.com/Comergent/fci/drawing/67996.pdf?src-supplier=Avnet, ComponentLink3Description=https://www.alliedelec.com/m/d/738c41368b909dba4b47243c40762f88.pdf?src-supplier=Allied+Electronics, ComponentLink3URL=https://www.alliedelec.com/m/d/738c41368b909dba4b47243c40762f88.pdf?src-supplier=Allied+Electronics, ComponentLink4Description=https://cdn.amphenol-icc.com/media/wysiwyg/files/drawing/67996.pdf?src-supplier=Digi-Key, ComponentLink4URL=https://cdn.amphenol-icc.com/media/wysiwyg/files/drawing/67996.pdf?src-supplier=Digi-Key, ComponentLink5Description=http://portal.fciconnect.com/Comergent/fci/drawing/67996.pdf?src-supplier=Avnet+Europe, ComponentLink5URL=http://portal.fciconnect.com/Comergent/fci/drawing/67996.pdf?src-supplier=Avnet+Europe, ComponentLink6Description=http://www.farnell.com/datasheets/1748781.pdf?src-supplier=Element14, ComponentLink6URL=http://www.farnell.com/datasheets/1748781.pdf?src-supplier=Element14, Connector Type="Male Pin", Contact Gender=Male, Contact Material=Bronze, Contact Mating Length=0.23inch, Contact Plating=Tin, Contact Post Length=3.05mm, Depth=4.83mm, Gender=Male, Housing Color=Black, Housing Material=Thermoplastic, Length=12.7mm, Manufacturer Part Number=67997-410HLF, Mount="Through Hole", Number of Contacts=10, Number of Positions=10, Number of Rows=2, Orientation=Straight, Packaging=Bulk, Pitch=2.54mm, Pricing 1="1=0.28, 10=0.266, 100=0.1864, 500=0.15982, 1000=0.13318, 5000=0.11415, 10000=0.10654 (USD)", REACH SVHC="No SVHC", Row Spacing=0.1inch, Stock 1=7926, Supplier 1=Digi-Key, Termination=Solder, Voltage Rating=1.5kV
P4 P5: "CONN HEADER VERT 3POS 2.54MM", Color=Black, Manufacturer="Wurth Electronics", Supplier Part Number 1=732-5316-ND, ComponentLink1Description=http://www.farnell.com/cad/1737268.pdf?src-supplier=Element14, ComponentLink1URL=http://www.farnell.com/cad/1737268.pdf?src-supplier=Element14, ComponentLink2Description=https://katalog.we-online.de/em/datasheet/6130xx11121.pdf?src-supplier=Digi-Key, ComponentLink2URL=https://katalog.we-online.de/em/datasheet/6130xx11121.pdf?src-supplier=Digi-Key, Connector Type="Male Pin", Contact Material=Copper, Contact Mating Length=0.236inch, Contact Plating=Gold, Gender=Male, Lead Free="Lead Free", Manufacturer Part Number=61300311121, Mount="Through Hole", Number of Contacts=3, Number of Positions=3, Number of Rows=1, Packaging=Bulk, Pitch=0.1inch, Pricing 1="1=0.13, 10=0.106, 25=0.088, 50=0.074, 100=0.067, 1000=0.061 (USD)", REACH SVHC=Unknown, Stock 1=81286, Supplier 1=Digi-Key, Termination=Solder
P6 P7: "CONN HEADER VERT 4POS 2.54MM", Color=Black, Manufacturer="Wurth Electronics", Supplier Part Number 1=732-5317-ND, ComponentLink1Description=http://www.farnell.com/cad/1737268.pdf?src-supplier=Element14, ComponentLink1URL=http://www.farnell.com/cad/1737268.pdf?src-supplier=Element14, ComponentLink2Description=https://katalog.we-online.de/em/datasheet/6130xx11121.pdf?src-supplier=Digi-Key, ComponentLink2URL=https://katalog.we-online.de/em/datasheet/6130xx11121.pdf?src-supplier=Digi-Key, Connector Type="Male Pin", Contact Material=Copper, Contact Mating Length=0.236inch, Contact Plating=Gold, Gender=Male, Lead Free="Lead Free", Manufacturer Part Number=61300411121, Mount="Through Hole", Number of Contacts=4, Number of Positions=4, Number of Rows=1, Packaging=Bulk, Pitch=0.1inch, Pricing 1="1=0.18, 10=0.153, 25=0.1272, 50=0.106, 100=0.096, 1000=0.088 (USD)", REACH SVHC=Unknown, Stock 1=20544, Supplier 1=Digi-Key, Termination=Solder
P8: "CONN HEADER VERT 5POS 2.54MM", Color=Black, Manufacturer="Wurth Electronics", Supplier Part Number 1=732-5318-ND, ComponentLink1Description=https://katalog.we-online.de/em/datasheet/6130xx11121.pdf?src-supplier=Digi-Key, ComponentLink1URL=https://katalog.we-online.de/em/datasheet/6130xx11121.pdf?src-supplier=Digi-Key, ComponentLink2Description=http://www.farnell.com/cad/1737268.pdf?src-supplier=Element14, ComponentLink2URL=http://www.farnell.com/cad/1737268.pdf?src-supplier=Element14, Connector Type="Male Pin", Contact Material=Copper, Contact Mating Length=0.236inch, Contact Plating=Gold, Gender=Male, Lead Free="Lead Free", Manufacturer Part Number=61300511121, Mount="Through Hole", Number of Contacts=5, Number of Positions=5, Number of Rows=1, Packaging=Bulk, Pitch=0.1inch, Pricing 1="1=0.25, 10=0.209, 25=0.174, 50=0.145, 100=0.132, 1000=0.12 (USD)", REACH SVHC=Unknown, Stock 1=27960, Supplier 1=Digi-Key, Termination=Solder
Q1 Q2 Q3: "MOSFET 2N-CH 60V 15A 12POWER", Continuous Drain Current (ID)=15A, Drain to Source Voltage (Vdss)=60V, Input Capacitance=5.245nF, Manufacturer="ON Semiconductor / Fairchild", Max Operating Temperature=150°C, Max Power Dissipation=1W, Min Operating Temperature=-55°C, Supplier Part Number 1=54AH8638, Category=MOSFETs, ComponentLink1Description=https://www.fairchildsemi.com/datasheets/FD/FDMD8260L.pdf?src-supplier=Digi-Key, ComponentLink1URL=https://www.fairchildsemi.com/datasheets/FD/FDMD8260L.pdf?src-supplier=Digi-Key, Element Configuration=Dual, FET Type="2 N-Channel", Manufacturer Part Number=FDMD8260L, Mount="Surface Mount", Number of Pins=12, Packaging="Tape and Reel", Pricing 1="1=3.19000, 10=2.87000, 25=2.72000, 50=2.54000, 100=2.35000, 250=2.18000, 500=2.01000, 1000=1.76000 (USD)", Rds On Max=5.8mR, RoHS=Yes, RoHS Compliant=Yes, Supplier 1=Newark, Weight=0.0823188g
R1 R2 R3 R4 R5 R6 R7 R9 R11 R13 R14 R26 R27: library part RC0603FR-074K7L, "RES SMD 4.7K OHM 1% 1/10W 0603", Case Code (Imperial)=0603, Case Code (Metric)=1608, Manufacturer=Yageo, Max Operating Temperature=155°C, Min Operating Temperature=-55°C, Power Rating=100mW, Resistance=4.7kR, Supplier Part Number 1=311-4.70KHRCT-ND, Temperature Coefficient=100ppm/°C, Tolerance=1%, Voltage Rating=50V, Case/Package=0603, ComponentLink1Description=https://www.verical.com/server-webapp/html/getDatasheet?partID=422754&src-supplier=Verical, ComponentLink1URL=https://www.verical.com/server-webapp/html/getDatasheet?partID=422754&src-supplier=Verical, ComponentLink2Description=http://www.farnell.com/datasheets/2167052.pdf?src-supplier=Element14, ComponentLink2URL=http://www.farnell.com/datasheets/2167052.pdf?src-supplier=Element14, ComponentLink3Description=http://www.farnell.com/datasheets/38590.pdf?src-supplier=Element14, ComponentLink3URL=http://www.farnell.com/datasheets/38590.pdf?src-supplier=Element14, ComponentLink4Description=http://www.farnell.com/datasheets/1868787.pdf?src-supplier=Element14, ComponentLink4URL=http://www.farnell.com/datasheets/1868787.pdf?src-supplier=Element14, Composition="Thick Film", Depth=0.8mm, Height=0.45mm, Lead Free="Lead Free", Lead Pitch=0.3mm, Length=1.6mm, Manufacturer Part Number=RC0603FR-074K7L, Military Standard=Not, Number of Pins=2, Packaging="Tape and Reel", Pricing 1="1=0.1, 10=0.023, 100=0.0094, 1000=0.00421, 2500=0.00366 (USD)", REACH SVHC="No SVHC", Stock 1=5337567, Supplier 1=Digi-Key, Termination=SMD/SMT, Voltage Rating (DC)=50V, Width=0.8mm
R8 R10 R12 R29 R30 R31: library part RC0603FR-071KL, "RES SMD 1K OHM 1% 1/10W 0603", Case Code (Imperial)=0603, Case Code (Metric)=1608, Manufacturer=Yageo, Max Operating Temperature=155°C, Min Operating Temperature=-55°C, Power Rating=100mW, Resistance=1kR, Supplier Part Number 1=311-1.00KHRDKR-ND, Temperature Coefficient=100ppm/°C, Tolerance=1%, Voltage Rating=50V, Case/Package=0603, ComponentLink1Description=https://www.verical.com/server-webapp/html/getDatasheet?partID=409289&src-supplier=Verical, ComponentLink1URL=https://www.verical.com/server-webapp/html/getDatasheet?partID=409289&src-supplier=Verical, ComponentLink2Description=http://documents.rs-components.com/techlib://itc_doclist_GB.htm?stockno=5048928&src-supplier=RSComponents, ComponentLink2URL=http://documents.rs-components.com/techlib://itc_doclist_GB.htm?stockno=5048928&src-supplier=RSComponents, ComponentLink3Description=http://www.yageo.com/documents/recent/PYu-RC0603_51_RoHS_L_4.pdf?src-supplier=Avnet+Europe, ComponentLink3URL=http://www.yageo.com/documents/recent/PYu-RC0603_51_RoHS_L_4.pdf?src-supplier=Avnet+Europe, ComponentLink4Description=http://www.farnell.com/datasheets/2167052.pdf?src-supplier=Element14, ComponentLink4URL=http://www.farnell.com/datasheets/2167052.pdf?src-supplier=Element14, ComponentLink5Description=http://www.farnell.com/datasheets/1868787.pdf?src-supplier=Element14, ComponentLink5URL=http://www.farnell.com/datasheets/1868787.pdf?src-supplier=Element14, ComponentLink6Description=http://www.yageo.com/documents/recent/PYu-RC_Group_51_RoHS_L_2.pdf?src-supplier=Avnet, ComponentLink6URL=http://www.yageo.com/documents/recent/PYu-RC_Group_51_RoHS_L_2.pdf?src-supplier=Avnet, ComponentLink7Description=https://www.verical.com/server-webapp/html/getDatasheet?partID=404327&src-supplier=Verical, ComponentLink7URL=https://www.verical.com/server-webapp/html/getDatasheet?partID=404327&src-supplier=Verical, ComponentLink8Description=http://www.farnell.com/datasheets/443971.pdf?src-supplier=Element14, ComponentLink8URL=http://www.farnell.com/datasheets/443971.pdf?src-supplier=Element14, Composition="Thick Film", Contact Plating=Tin,Matte, Depth=0.8mm, Height=0.45mm, Lead Free="Lead Free", Length=1.6mm, Manufacturer Part Number=RC0603FR-071KL, Military Standard=Not, Packaging="Tape and Reel", Pricing 1="1=0.1, 10=0.023, 100=0.0094, 1000=0.0042, 2500=0.0037 (USD)", Radiation Hardening=No, REACH SVHC="No SVHC", Stock 1=21472395, Supplier 1=Digi-Key, Termination=SMD/SMT
R15 R16 R17 R18 R21 R22 R23: library part ARG03FTC2700, "270Ω 0603 Chip Resistor - Surface Mount ROHS", Manufacturer="Viking Tech", ComponentLink1Description=LCSC, ComponentLink1URL=https://lcsc.com/product-detail/Chip-span-style-background-color-ff0-Resistor-span-Surface-Mount_Viking-Tech-ARG03FTC2700_C217921.html, Manufacturer Part Number=ARG03FTC2700
R19 R20: library part RC0603FR-07150RL, "RES SMD 150OHM 1/10W 0603", Case Code (Imperial)=0603, Case Code (Metric)=1608, Manufacturer=Yageo, Max Operating Temperature=155°C, Max Power Dissipation=100mW, Min Operating Temperature=-55°C, Package Quantity=5000, Resistance Tolerance=1%, Resistor Type="Thick Film", Supplier Part Number 1=311-150HRCT-ND, Temperature Coefficient=100ppm/°C, Voltage Rating=50V, Case/Package=0603, Category="Chip SMD Resistors", ComponentLink1Description=https://datasheet.ciiva.com/46412/443971-46412844.pdf?src-supplier=Element14, ComponentLink1URL=https://datasheet.ciiva.com/46412/443971-46412844.pdf?src-supplier=Element14, ComponentLink2Description=https://datasheet.ciiva.com/46440/1868787-46440893.pdf?src-supplier=Element14, ComponentLink2URL=https://datasheet.ciiva.com/46440/1868787-46440893.pdf?src-supplier=Element14, ComponentLink3Description=https://datasheet.ciiva.com/12555/rc0603-272842-12555301.pdf?src-supplier=Mouser, ComponentLink3URL=https://datasheet.ciiva.com/12555/rc0603-272842-12555301.pdf?src-supplier=Mouser, Construction=Rectangular, Depth=0.8mm, Features="Moisture Resistant", Height=0.45mm, Lead Free="Lead Free", Length=1.6mm, Manufacturer Part Number=RC0603FR-07150RL, Military Standard=Not, Number of Pins=2, Number of Terminations=2, Packaging="Tape and Reel", Power Rating=100mW, Pricing 1="1=0.10000, 10=0.02400, 100=0.00970, 1000=0.00436, 2500=0.00378 (USD)", REACH SVHC="No SVHC", Resistance=150R, RoHS=Yes, RoHS Compliant=Yes, Series=RC, Size Code=0603, Stock 1=263721, Supplier 1=Digi-Key, Termination=SMD/SMT, Tolerance=1%, Voltage Rating (DC)=50V, Width=0.8mm